# Altium PCB Day.PcbDoc
Units mm, origin at the board's own origin, x right, y up, seen from the top; angles counter-clockwise.
Board outline 50.8 x 29.84 mm, 2 copper layers (Top Layer, Bottom Layer); 32 components, 28 nets, 127 pads, 28 vias.
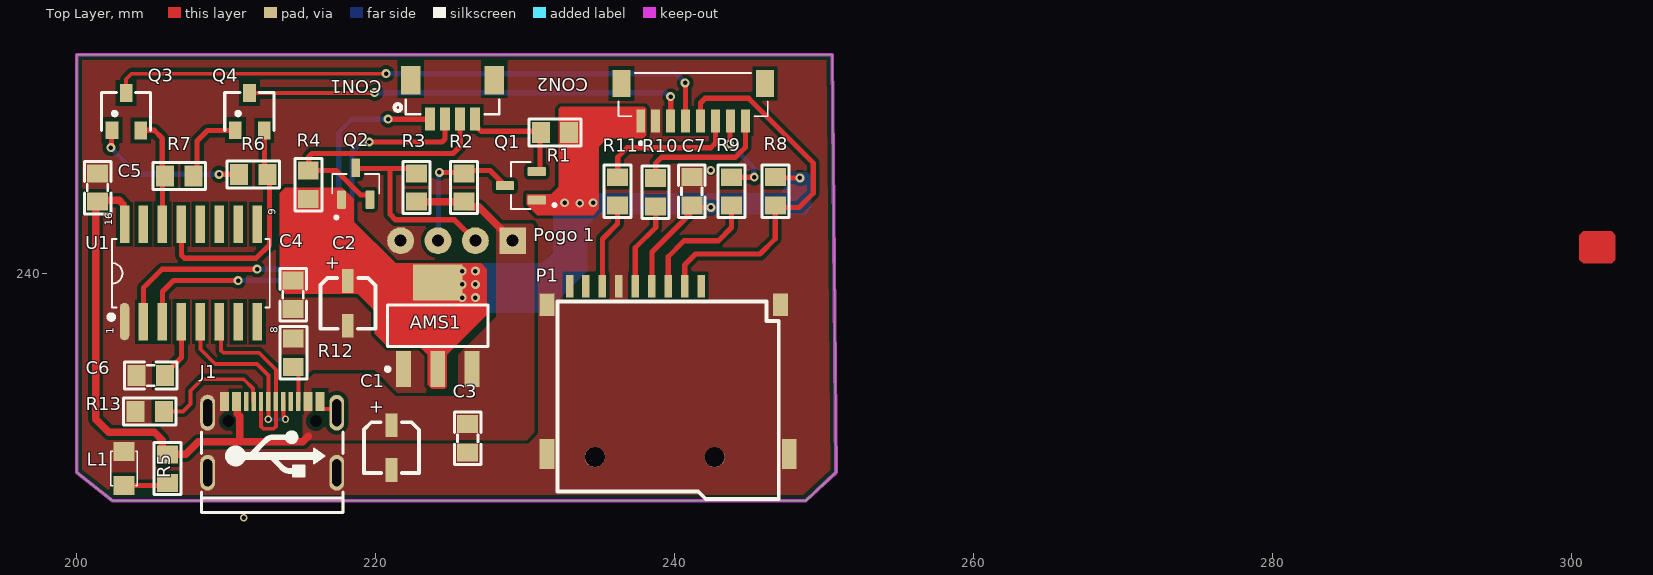
[diagram p0: Top Layer view]
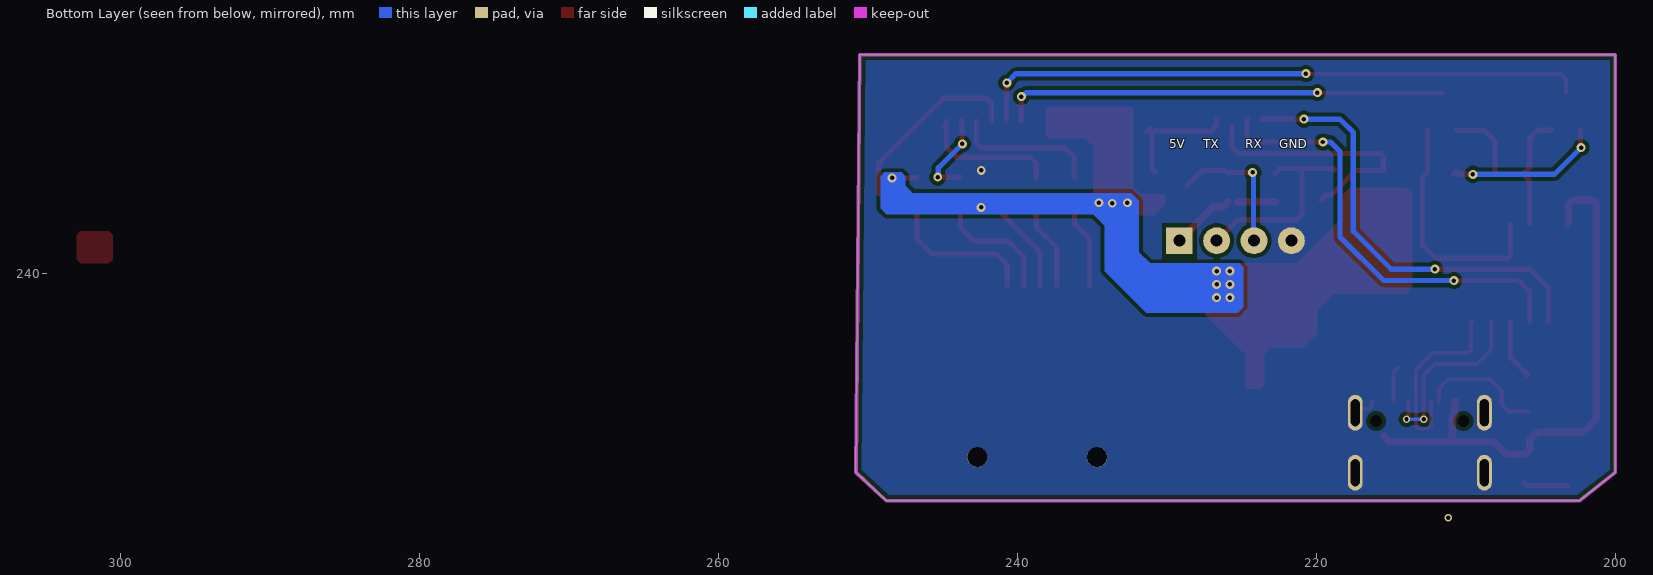
[diagram p1: Bottom Layer view, seen from below]
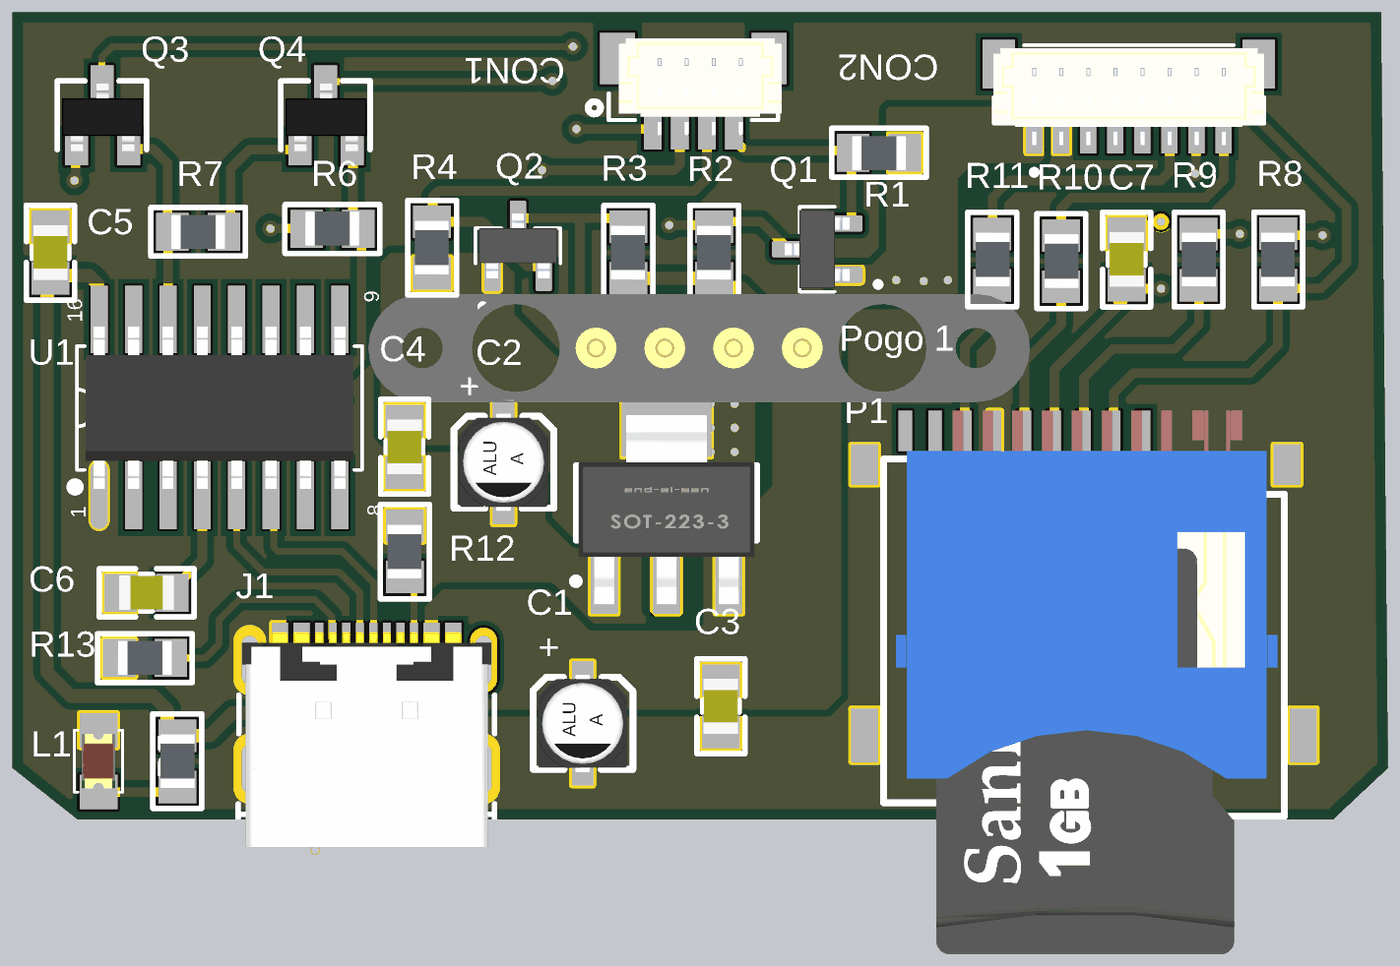
[diagram p2: 3D render of the assembled board from above, using the file's embedded part models]

## Layer stack, top to bottom
Top Solder: solder mask 0.0102, Solder Resist, Dk 3.5
Top Layer: signal copper 0.0356
Dielectric 1: dielectric 0.32, FR-4, Dk 4.8
Bottom Layer: signal copper 0.0356
Bottom Solder: solder mask 0.0102, Solder Resist, Dk 3.5

## Board outline
200.025,226.695 202.438,224.79 248.793,224.79 250.825,226.695 250.571,254.635 200.025,254.635

## Design rules (kind name [scope] priority, off if disabled: settings)
Clearance [All] p1: gap=0.254 ignorepadtopadclearanceinfootprint=FALSE
DiffPairsRouting [All] p1: maxlimit=0.254 minlimit=0.1 mostfreqgap=0.254 toplayer_minwidth=0.254 toplayer_maxwidth=0.381 toplayer_prefwidth=0.381 bottomlayer_minwidth=0.254 bottomlayer_maxwidth=0.381 bottomlayer_prefwidth=0.381 maxuncoupledlength=12.7
PolygonConnect [All] p1: connectstyle=Direct reliefconductorwidth=0.254 reliefentries=4 polygonreliefangle="90 Angle" airgapwidth=0.254
RoomDefinition Day [InComponentClass('Day')] p1: confinementstyle=ConfineIn formatcopy=TRUE lockcomponents=FALSE outline 0,0 50.8,0 50.8,25.4 0,25.4
RoutingVias [All] p1: holewidth=0.3 width=0.6 viastyle="Through Hole" minholewidth=0.3 minwidth=0.6 maxholewidth=0.3 maxwidth=0.6
SolderMaskExpansion [All] p1: expansion=0.102 istentingtop=FALSE
Width [All] p1: maxlimit=0.5 minlimit=0.254 preferedwidth=0.35
29 further rules are at their usual default settings.

## Classes and differential pairs
component class Day: AMS1 C2 C4 C5 C7 CON2 J1 L1 P1 "Pogo 1" Q1 Q2 R3 R4 R8 R9 R11 R13 U1
differential pair USB.D: +USB.D_P -USB.D_N

## Components (designator, comment, footprint, x,y, rotation, side; value= is the part's Value field where it differs from the comment)
AMS1 "AMS1117-3.3V" SOT223_3 224.155,236.474 r90 top value="AMS1117-3.3V SOT223"
C1 "10uF" CAP-ALUM-3054-TYPE-A 221.107,228.346 r270 top
C2 "10uF" CAP-ALUM-3054-TYPE-A 218.186,237.998 r270 top
C3 "104" "tu 0805" 226.187,228.981 r270 top
C4 "104" "tu 0805" 214.506,238.571 r270 top
C5 "104" "tu 0805" 201.422,245.745 r90 top
C6 "104" "tu 0805" 204.978,233.172 r180 top
C7 "104" "tu 0805" 241.173,245.491 r90 top
CON1 "Header 4pin 1.0mm" "CONN4_BM04B-SRSS_JST - duplicate" 225.171,252.222 r0 top
CON2 "Header 8pin 1.0mm" JST_BM08B-SRSS-TB(LF)(SN) 241.26,251.965 r0 top
J1 "USB TYPE C" "USB type c CAM" 213.106,229.052 r0 top (schematic designator J2)
L1 "LED 0805" LED-0805-Red 203.2,225.806 r90 top
P1 "Micro SD card" MicroSD 239.597,239.411 r0 top locked
"Pogo 1" "Pogo 4 pin" "Pogo 4 pin" 229.449,245.237 r180 top locked
Q1 "BSS138" SOT95P240X111-3N 229.743,245.872 r180 top
Q2 "BSS138" SOT95P240X111-3N 218.694,245.999 r90 top
Q3 "BC817" SOT-23 203.327,250.825 r0 top value=C9014
Q4 "BC817" SOT-23 211.582,250.825 r0 top value=C9014
R1 "10K" "RES 0805" 232.029,249.428 r180 top
R2 "10K" "RES 0805" 225.933,245.745 r90 top
R3 "10K" "RES 0805" 222.758,245.745 r90 top
R4 "10K" "RES 0805" 215.509,245.929 r90 top
R5 "1K" "RES 0805" 206.121,226.949 r270 top
R6 "10K" "RES 0805" 211.836,246.634 r0 top
R7 "10K" "RES 0805" 206.883,246.507 r180 top
R8 "10K" "RES 0805" 246.761,245.491 r90 top
R9 "0R" "RES 0805" 243.84,245.491 r270 top
R10 "0R" "RES 0805" 238.77,245.434 r270 top
R11 "0R" "RES 0805" 236.22,245.491 r270 top
R12 "5.1K" "RES 0805" 214.503,234.696 r90 top
R13 "5.1K" "RES 0805" 204.913,230.769 r0 top
U1 "CH340C" SOIC16_50_284_25X90_SMT 207.645,240.03 r90 top

## Footprints (in the part's own frame and the unit in brackets; to place one, negate y for a bottom-side part, rotate by r counter-clockwise, add the part's x,y. Pads: shape width x height; smd on the part's side, far side on the other; paste and mask are expansions set on the pad)
CAP-ALUM-3054-TYPE-A [mm]
  rect 1.6x0.8 smd: 1(-1.5,-0.025) 2(1.5,-0.025)
  silkscreen extent -1.7,-1.85 1.7,1.83, body extent -1.8,-1.68 1.8,1.62, height 5.4
"CONN4_BM04B-SRSS_JST - duplicate" [mil]
  rect 26x61 smd: 1(-59.06,-74.1) 2(-19.68,-74.1) 3(19.68,-74.1) 4(59.06,-74.1)
  rect 51x75 smd: 5(-110.24,27.47) 6(110.24,27.47)
  silkscreen extent -153,-62 123,-23, body extent -108,-85 128,57, height 171
JST_BM08B-SRSS-TB(LF)(SN) [mm]
  rect 0.6x1.55 smd: 1(-3.5,-1.775) 2(-2.5,-1.775) 3(-1.5,-1.775) 4(-0.5,-1.775) 5(0.5,-1.775) 6(1.5,-1.775) 7(2.5,-1.775) 8(3.5,-1.775)
  rect 1.2x1.8 smd: S1(-4.8,0.75) S2(4.8,0.75)
  silkscreen extent -5,-3.35 5,1.45, body extent -5,-2.27 5,1.33, height 4.25
LED-0805-Red [mil]
  rect 50x55 smd: 1(0,0) 2(90,0)
  silkscreen extent 0,-35 90,35, body extent 5,-25 85,25, height 43
MicroSD [mm]
  rect 1x2 smd: 0(-8.1,-11.5) 0(8.1,-11.5)
  rect 1x1.5 smd: 0(-8.1,-1.5) 0(7.5,-1.5)
  round 1.35 hole 1.35: 0(-4.9,-11.7) 0(3.1,-11.7)
  rect 0.5x1.5 smd: 1(1.1,-0.254) 2(0,-0.254) 3(-6.6,-0.254) 4(-1.1,-0.254) 5(-2.2,-0.254) 6(-3.3,-0.254) 7(-4.4,-0.254) 8(-5.5,-0.254) 9(2.2,-0.254)
  silkscreen extent -7.4,-14.5 7.4,-1.3, body extent -6.95,-19.6 7.15,0.5, height 1.91
"Pogo 4 pin" [mm]
  rect 1.8x1.8 hole 0.8: 1(0.254,3.048)
  round 1.8 hole 0.8: 2(2.754,3.048) 3(5.254,3.048) 4(7.754,3.048)
  body extent -8.16,1.02 16.28,5.02, height 2.5
"RES 0805" [mm]
  rect 1.2x1.4 smd: 1(-0.946,-0.01) 2(0.954,-0.01)
  silkscreen extent -1.75,-0.91 1.75,0.89, body extent -1,-0.62 1,0.63, height 0.5
SOIC16_50_284_25X90_SMT [mm]
  oval 2.5x0.635 smd mask+0.076: 1(-3.25,4.42)
  rect 2.5x0.635 smd mask+0.076: 2(-3.25,3.15) 3(-3.25,1.88) 4(-3.25,0.61) 5(-3.25,-0.66) 6(-3.25,-1.93) 7(-3.25,-3.2) 8(-3.25,-4.47) 9(3.25,-4.47) 10(3.25,-3.2) 11(3.25,-1.93) 12(3.25,-0.66) 13(3.25,0.61) 14(3.25,1.88) 15(3.25,3.15) 16(3.25,4.42)
  silkscreen extent -3.07,-5.3 2.26,5.44, body extent -3.02,-4.97 2.98,4.93, height 1.4
SOT95P240X111-3N [mm]
  rrect25% 1.23x0.6 smd: 1(-1.06,0.95) 2(-1.06,-0.95) 3(1.06,0)
  silkscreen extent -2.35,-1.57 0.65,1.57, body extent -1.2,-1.45 1.2,1.45, height 1.11
SOT223_3 [mm] "CASE: SOT223"
  rect 2.4x1 smd: 1(-2.875,2.275) 2(-2.875,-0.025) 3(-2.875,-2.325)
  rect 2.4x3.3 smd: 4(2.925,-0.025)
  silkscreen extent -3,-3.38 1.43,3.45, body extent -3.73,-3.28 3.27,3.22, height 1.7
SOT-23 [mm] "SOT 23 _ 1-3-2"
  rect 0.85x1.2 smd: 1(-0.94,-1.245) 2(0.985,-1.25) 3(0.005,1.25)
  silkscreen extent -1.65,-1.27 1.65,1.27, body extent -1.47,-1.33 1.53,1.17, height 1.06
"tu 0805" [mm] "Compoment SMD 80x50mil"
  rect 1.2x1.4 smd: 1(-0.946,-0.003) 2(0.954,-0.003)
  silkscreen extent -1.75,-0.89 1.75,0.89, body extent -1.01,-0.64 1.01,0.63, height 0.61
"USB type c CAM" [mm]
  rect 0.6x1.25 smd: A1(-3.2,2.385) A4(-2.4,2.385) A9(2.4,2.385) A12(3.2,2.385)
  rect 0.3x1.25 smd: A5(-1.25,2.385) A6(-0.25,2.385) A7(0.25,2.385) A8(1.25,2.385) B5(1.75,2.385) B6(0.75,2.385) B7(-0.75,2.385) B8(-1.75,2.385)
  round 0.4 hole 0.8 unplated: MH1(-2.921,1.072) MH2(2.921,1.072)
  oval 1x2.4 hole 1.8 slot 0.6 at 0 deg: MH3(-4.318,1.634) MH4(4.318,1.631) MH5(-4.318,-2.382) MH6(4.318,-2.385)
  silkscreen extent -4.75,-5.06 4.72,0.34, body extent -4.6,-5.28 4.6,2.67, height 3.2

## Part data
AMS1: library part "AMS1117 SMD", "Dán", Chung_Loai=Dán, Don_Vi=Con, Ma_Hang=MH000596
C1 C2: library part CAP-ALUM-SMD, "CASE-A-3216-18(mm) Aluminum Capacitors"
C3 C4 C5 C6 C7: library part "Tu 0805 104 50V 10%", "Dán", Chung_Loai=Dán, Don_Vi=Con, Ma_Hang=MH004551, So_Chan=2, Ten_Linh_Kien="Tụ 0805 104-100nF 10% 50V"
CON1: "Connector Header Surface Mount, Right Angle 4 position 0.039 (1.00mm)", Package=None, Check_prices=https://www.snapeda.com/parts/SM04B-SRSS-TB/JST/view-part/?ref=eda, MF="JST Sales", MP=SM04B-SRSS-TB, SnapEDA_Link=https://www.snapeda.com/parts/SM04B-SRSS-TB/JST/view-part/?ref=snap
CON2: "SH Series 8 Position 1 mm Pitch Surface Mount Side Entry Shrouded Header", Package=None, Availability=Unavailable, MF="{'manufacturer': u'JST Sales America Inc.'}", MP=SM08B-SRSS-TB, Price=None
J1: "Connector", Manufacturer_Name="GCT (GLOBAL CONNECTOR TECHNOLOGY)", Manufacturer_Part_Number=USB4800-03-A, Mouser Part Number=640-USB4800-03-A, Datasheet Link=https://gct.co/connector/usb4800, Height=5.58mm, Mouser Price/Stock=https://www.mouser.co.uk/ProductDetail/GCT/USB4800-03-A?qs=vvQtp7zwQdMkfG8vViEZoQ%3D%3D
L1: library part "LED 0805 Do", "Dán", Chung_Loai=Dán, Don_Vi=Con, Ma_Hang=MH000897, Ten_Linh_Kien="LED 0805 Màu Đỏ (Red)"
Q1 Q2: "N-Channel 50 V 220mA (Ta) 350mW (Ta) Surface Mount SOT-23-3", Package="SOT-23-3 ON Semiconductor", Check_prices=https://www.snapeda.com/parts/BSS138/Onsemi/view-part/?ref=eda, MF=onsemi, MP=BSS138, SnapEDA_Link=https://www.snapeda.com/parts/BSS138/Onsemi/view-part/?ref=snap
Q3 Q4: library part "Trans BC817", "SOT-23 - C8658"
R1 R2 R3 R4 R5 R6 R7 R8 R9 R10 R11 R12 R13: library part "RES 0805", "RES SMD 0805", Manufacturer="Vishay Dale", Manufacturer Part Number=CRCW040210K0FKED, Operating Temperature="-55°C ~ 155°C", Package / Case="0402 (1005 Metric)", Power (Watts)="0.063W, 1/16W", Resistance (Ohms)=10k, Supplier Part Number 1=541-10.0KLCT-ND, Temperature Coefficient=±100ppm/°C, Tolerance=±1%, Category=Resistors, ComponentLink1Description=http://www.vishay.com/docs/20035/dcrcwe3.pdf, ComponentLink1URL=http://www.vishay.com/docs/20035/dcrcwe3.pdf, Composition="Thick Film", Features="Automotive AEC-Q200", Height="0.016\" (0.40mm)", Number of Terminations=2, Packaging="Cut Tape (CT)", Pricing 1="10=0.083, 50=0.0444, 200=0.0255, 1000=0.0174 (USD)", RoHS="RoHS Compliant", Size / Dimension="0.039\" L x 0.020\" W (1.00mm x 0.50mm)", Stock 1=2392462, Supplier 1=Digi-Key, Supplier Device Package="0402 (1005 Metric)"
U1: "USB Bridge, USB to UART USB 2.0 UART Interface", Alternate Part Number-1=NA, Case/Package=SOIC16, Manufacturer=Olimex, Supplier Part Number-1=C84681, Manufacturer Part Number=CH340C, Supplier-1=LCSC

## Via types
v1: diameter 0.6, hole 0.3, Top Layer to Bottom Layer, tented both sides, 24 vias
v2: diameter 0.5, hole 0.3, Top Layer to Bottom Layer, tented both sides, 3 vias
v3: diameter 0.6, hole 0.3, Top Layer to Bottom Layer, 1 vias

## Nets (pads, with @x,y where several pads share a name; then routed paths per layer and width w, separated by ;. In a path a pad name is that pad's centre, name@x,y a point inside that pad or via, vN(x,y) a via of type N, cw(c..) or ccw(c..) an arc to the next point about the centre after c; other vN are vias at no path point)
+5: "Pogo 1.1" AMS1.3 C1.1 C3.1 C5.1 J1.A4 J1.A9 R2.1 R3.1 R5.1 U1.16 | length 43.6
  Top Layer w0.5: U1.16 203.157,243.348 203.157,244.602 202.865,244.895 201.521,244.895 201.295,244.669 201.295,230.251 202.184,229.362 205.232,229.362 205.74,228.854 205.74,228.245 206.09,227.895 R5.1 207.321,227.895 208.153,228.727 210.947,228.727 210.935,228.739 ; J1.A4 210.756,231.387 210.756,230.614 210.935,230.435 210.935,228.739 ; 215.519,229.108 215.15,228.739 210.935,228.739 ; R3.1 R2.1@225.308,244.799 ; R2.1 226.293,244.449 226.935,244.449 229.195,242.189
EN: CON2.4 Q3.3 | length 41.3
  Top Layer w0.254: Q3.3 203.332,252.989 203.708,253.365 v1(220.726,253.365)
  Top Layer w0.35: v1(240.736,252.744) 240.748,252.732 240.748,250.202 CON2.4
  Bottom Layer w0.35: v1(220.726,253.365) 240.115,253.365 v1(240.736,252.744)
GND: "Pogo 1.4" AMS1.1 C1.2 C2.2 C3.2 C4.2 C5.2 C6.2 C7.2 CON2.2 J1.A1 J1.A12 J1.MH3 J1.MH4 J1.MH5 J1.MH6 L1.2 P1.0 P1.6 R12.2 R13.1 U1.1 | length 2.2
  Top Layer w0.254: J1.A12 216.306,231.112 216.479,230.939 217.096,230.939 217.297,231.14 217.424,231.013 J1.MH4 ; v3@242.316,247.015 v3(242.443,246.888)
IO0: CON2.3 Q4.3 | length 29.9
  Top Layer w0.254: Q4.3 219.817,252.075 219.837,252.095 v1(219.964,252.095)
  Top Layer w0.35: CON2.3 CON2.3 v1(239.762,251.827) v1(239.762,251.827)
  Bottom Layer w0.35: v1(219.964,252.095) 239.426,252.095 239.694,251.827 v1(239.762,251.827)
NetC6_1: C6.1 U1.4 | length 4.1
  Top Layer w0.35: C6.1 205.924,233.275 207.035,234.387 U1.4
NetJ1_A5: J1.A5 R13.2 | length 8.5
  Top Layer w0.254: R13.2 207.137,230.759 207.645,231.267 207.645,232.156 208.407,232.918 211.201,232.918 211.825,232.294 211.825,231.468 J1.A5
NetJ1_B5: J1.B5 R12.1 | length 2.5
  Top Layer w0.254: R12.1 214.856,233.407 J1.B5
NetL1_1: L1.1 R5.2 | length 3
  Top Layer w0.35: L1.1 205.922,225.806 R5.2
NetP1_2: P1.2 R9.2 | length 8.4
  Top Layer w0.35: P1.2 239.597,241.121 240.665,242.189 242.951,242.189 243.84,243.078 R9.2@243.84,244.48
NetP1_5: P1.5 R10.2 | length 5.9
  Top Layer w0.35: P1.5 237.397,241.715 238.76,243.078 R10.2
NetP1_7: P1.7 R11.2 | length 5.8
  Top Layer w0.35: P1.7 235.197,242.309 236.21,243.322 R11.2
NetQ3_1: Q3.1 R6.1 | length 10.7
  Top Layer w0.35: v1(202.311,248.412) 202.349,248.45 202.349,249.542 Q3.1 ; v1(209.55,246.634) 210.504,246.634 210.693,246.823 210.693,246.821 R6.1
  Bottom Layer w0.35: v1(202.311,248.412) 204.089,246.634 v1(209.55,246.634)
NetQ3_2: Q3.2 R7.2 U1.14 | length 7.8
  Top Layer w0.35: Q3.2 205.212,249.575 205.758,249.029 205.758,247.069 206.183,246.644 205.765,246.226 U1.14
NetQ4_1: Q4.1 R7.1 | length 5.1
  Top Layer w0.35: R7.1@208.083,246.644 208.083,248.85 208.788,249.555 210.617,249.555 Q4.1
NetQ4_2: Q4.2 R6.2 U1.13 | length 16.2
  Top Layer w0.35: U1.13 207.035,241.218 207.24,241.013 212.022,241.013 212.92,241.911 212.92,246.494 212.598,246.816 212.598,249.544 Q4.2
RX_0: CON1.1 U1.2 | length 30
  Top Layer w0.35: U1.2 204.495,239.039 205.74,240.284 v1(212.09,240.284) ; v1(220.853,250.317) 223.648,250.317 CON1.1
  Bottom Layer w0.35: v1(212.09,240.284) 215.011,240.284 217.551,242.824 217.551,249.428 218.44,250.317 v1(220.853,250.317)
RX_1: CON1.4 Q1.2 R1.2 | length 7.8
  Top Layer w0.35: CON1.4 226.671,249.895 226.826,249.74 226.852,249.74 227.042,249.551 227.081,249.511 R1.2@230.803,249.511 ; Q1.2 230.888,246.822 231.013,246.947 231.013,249.376 R1.2 ; R1.2@231.153,249.681 R1.2@231.385,249.448
RXD1: "Pogo 1.3" Q1.3 R2.2 | length 9.5
  Top Layer w0.35: v1(224.282,246.761) 225.881,246.761 R2.2 226.132,246.888 227.667,246.888 Q1.3
  Bottom Layer w0.35: 224.195,242.189 224.238,242.233 224.238,246.717 v1(224.282,246.761)
SD_CS: CON2.5 P1.1 R8.1 | length 26.1
  Top Layer w0.35: P1.1 240.697,240.57 241.427,241.3 245.745,241.3 246.761,242.316 246.761,244.348 R8.1@246.888,244.475 ; CON2.5 241.76,251.412 ; 241.76,251.44 241.76,251.412 ; R8.1@246.771,244.418 248.355,244.418 249.301,245.364 249.301,247.396 244.983,251.714 242.062,251.714 241.76,251.412
SD_MISO: CON2.6 R11.1 | length 9.7
  Top Layer w0.35: R11.1 236.22,246.447 236.22,247.777 236.855,248.412 242.443,248.412 242.76,248.729 CON2.6
SD_MOSI: CON2.7 R9.1 | length 6
  Top Layer w0.35: v1(243.713,248.666) 243.737,248.69 243.737,250.166 CON2.7 ; R9.1 v1(245.354,246.437)
  Bottom Layer w0.35: v1(243.713,248.666) 245.316,247.063 245.316,246.428 v1@245.364,246.38
SD_SCK: CON2.8 R10.1 | length 9.3
  Top Layer w0.35: R10.1 238.76,247.396 239.141,247.777 244.094,247.777 244.76,248.443 244.76,249.713 244.856,249.809 244.76,249.905 CON2.8
TX_0: CON1.2 U1.3 | length 29.8
  Top Layer w0.35: U1.3 205.765,238.785 206.502,239.522 v1(210.82,239.522) ; v1(219.583,248.793) 224.466,248.793 224.671,248.998 CON1.2
  Bottom Layer w0.35: v1(210.82,239.522) 215.519,239.522 218.44,242.443 218.44,248.158 219.075,248.793 v1(219.583,248.793)
TX_1: CON1.3 Q2.2 R4.2 | length 17.8
  Top Layer w0.35: Q2.2@219.708,244.875 219.519,245.064 219.519,245.242 219.033,245.242 217.392,246.883 215.619,246.883 R4.2 215.545,246.909 215.545,247.803 215.773,248.031 225.212,248.031 225.679,248.498 225.679,248.744 225.679,249.047 ; 225.671,249.047 CON1.3@225.671,249.832
TXD1: "Pogo 1.2" Q2.3 R3.2 | length 13.6
  Top Layer w0.35: Q2.3@218.821,246.932 218.904,247.015 220.98,247.015 ; R3.2 222.452,247.015 220.98,247.015 ; 226.695,242.189 225.298,243.586 221.361,243.586 220.98,243.967 220.98,247.015
USB.D_N: J1.A7 J1.B7 U1.6 | length 12.8
  Top Layer w0.254: U1.6 209.677,236.678 209.677,234.845 209.826,234.696 212.217,234.696 213.356,233.557 J1.A7 213.36,231.433 213.36,229.765 213.211,229.616 212.505,229.616 212.356,229.765 J1.B7
USB.D_P: J1.A6 J1.B6 U1.5 | length 12.4
  Top Layer w0.254: U1.5 208.305,234.925 209.296,233.934 212.09,233.934 212.856,233.168 J1.A6 212.854,231.435 212.854,230.253 v2(212.852,230.251) ; J1.B6 213.856,230.39 v2(213.995,230.251)
  Bottom Layer w0.254: v2(212.852,230.251) v2(213.995,230.251)
VCC: AMS1.2 AMS1.4 C2.1 C4.1 C7.1 CON2.1 P1.4 Q1.1 Q2.1 R1.1 R4.1 R8.2 | length 50
  Top Layer w0.35: AMS1.4 AMS1.4@224.312,239.268 ; v1(225.806,238.379) 225.201,238.379 AMS1.4@224.312,239.268 ; v1(225.806,239.268) AMS1.4@224.312,239.268 ; Q1.1@230.505,244.797 230.63,244.922 Q1.1 ; R1.1@232.664,249.652 232.918,249.906 232.918,250.825 ; P1.4 238.506,239.166 238.506,241.427 241.046,243.967 240.833,243.967 241.176,244.311 C7.1 241.308,244.413 v1(242.446,244.413) ; R8.2 246.828,246.389 v1(248.412,246.389)
  Top Layer w0.5: 233.67,246.437 233.67,249.037 234.823,250.19 CON2.1
  Bottom Layer w0.35: v1(225.806,239.268) v1(226.695,239.268) ; v1@226.822,239.141 v1(226.695,239.268) ; v1(233.68,244.695) 233.68,244.628 233.138,244.086 233.138,243.822 233.045,243.729 233.045,240.538 231.775,239.268 226.822,239.268 v1(226.695,239.268) ; v1(234.569,244.729) 242.063,244.729 242.427,244.366 v1@242.429,244.366 ; v1@242.689,244.348 248.207,244.348 248.412,244.553 v1@248.412,246.262
  other v1: 226.695,238.379 225.806,240.157 226.695,240.157 232.664,244.729
pads on no net: CON1.5 CON1.6 CON2.S1 CON2.S2 J1.A8 J1.B8 J1.MH1 J1.MH2 P1.3 P1.8 P1.9 U1.7 U1.8 U1.9 U1.10 U1.11 U1.12 U1.15
copper on no net:
  other v2: 211.205,223.651

## Polygon pours and split planes (outlines as drawn)
GND on Top Layer "GND_L01_P003" (solid, pour order 3): 199.99,254.927 200.244,254.673 250.536,254.673 250.536,226.86 248.631,224.955 201.895,224.955 199.99,226.86
+5 on Top Layer "+5_L01_P000" (solid, pour order 0): 215.138,232.537 215.9,233.299 219.837,233.299 221.361,231.775 225.298,231.775 225.552,232.029 225.552,234.569 228.092,237.109 228.092,243.078 228.346,243.332 230.505,243.332 230.632,243.205 230.632,229.362 230.124,228.854 215.138,228.854
GND on Bottom Layer "GND_L02_P001" (solid, pour order 1): 200.025,254.762 200.279,254.508 250.571,254.508 250.571,226.695 248.666,224.79 201.93,224.79 200.025,226.695

## Keep-outs
Keep-Out Layer:
  the board outline again, w0.254

## Other copper
Top Layer:
  region net VCC: 238.125,251.016 237.998,251.142 232.41,251.142 232.283,251.016 232.283,245.808 231.775,245.3 230.124,245.3 230.124,244.602 230.823,243.903 234.569,243.903 234.95,244.285 234.95,248.475 235.522,249.047 237.934,249.047 238.125,249.237
  region net VCC: 217.805,245.745 218.567,244.983 218.567,243.459 221.361,240.665 227.076,240.665 227.457,240.284 227.457,237.236 224.79,234.569 224.79,232.41 224.663,232.283 223.774,232.283 223.52,232.537 223.52,234.569 223.012,235.077 220.853,235.077 219.964,235.966 219.964,237.49 218.821,238.633 213.995,238.633 213.614,239.014 213.614,245.364 213.995,245.745
  region net +5: 302.704,242.824 300.799,242.824 300.546,242.57 300.546,240.919 300.799,240.665 302.704,240.665 302.959,240.919 302.959,242.57
Bottom Layer:
  region net VCC: 225.171,240.665 224.917,240.411 224.917,237.744 225.298,237.363 231.394,237.363 234.188,240.157 234.188,243.205 234.95,243.967 248.793,243.967 249.174,244.348 249.174,246.507 248.92,246.761 247.777,246.761 247.523,246.507 247.523,245.872 247.015,245.364 232.41,245.364 231.902,244.856 231.902,241.427 231.14,240.665

## Silkscreen, mask and mechanical layers (free items; w line width, h text height)
Bottom Overlay:
  text "GND" at 222.504,248.169 h1
  text "RX" at 224.79,248.158 h1
  text "TX" at 227.584,248.158 h1
  text "5V" at 229.87,248.169 h1
Mechanical 1:
  circle w0.013: c221.615,242.189 r0.35
  circle w0.013: c224.155,242.189 r0.35
  circle w0.013: c226.695,242.189 r0.35
  circle w0.013: c229.235,242.189 r0.35

## Text inside footprints (layer, text, board x,y; h text height)
C1: Top Overlay "+" at 219.382,231.546 h1.52 r270
C2: Top Overlay "+" at 216.461,241.198 h1.52 r270
U1: Top Overlay "1" at 202.717,235.941 h0.89 r90; Top Overlay "8" at 213.677,236.014 h0.89 r90; Top Overlay "9" at 213.554,243.908 h0.89 r90; Top Overlay "16" at 202.59,243.18 h0.89 r90